# Altium PCB QI9-2604-A01_.PcbDoc (part 1 of 3)
Units mm, origin at the board's own origin, x right, y up, seen from the top; angles counter-clockwise.
Board outline 152.4 x 101.6 mm, 2 copper layers (Top Layer, Bottom Layer); 241 components, 189 nets, 865 pads, 150 vias.
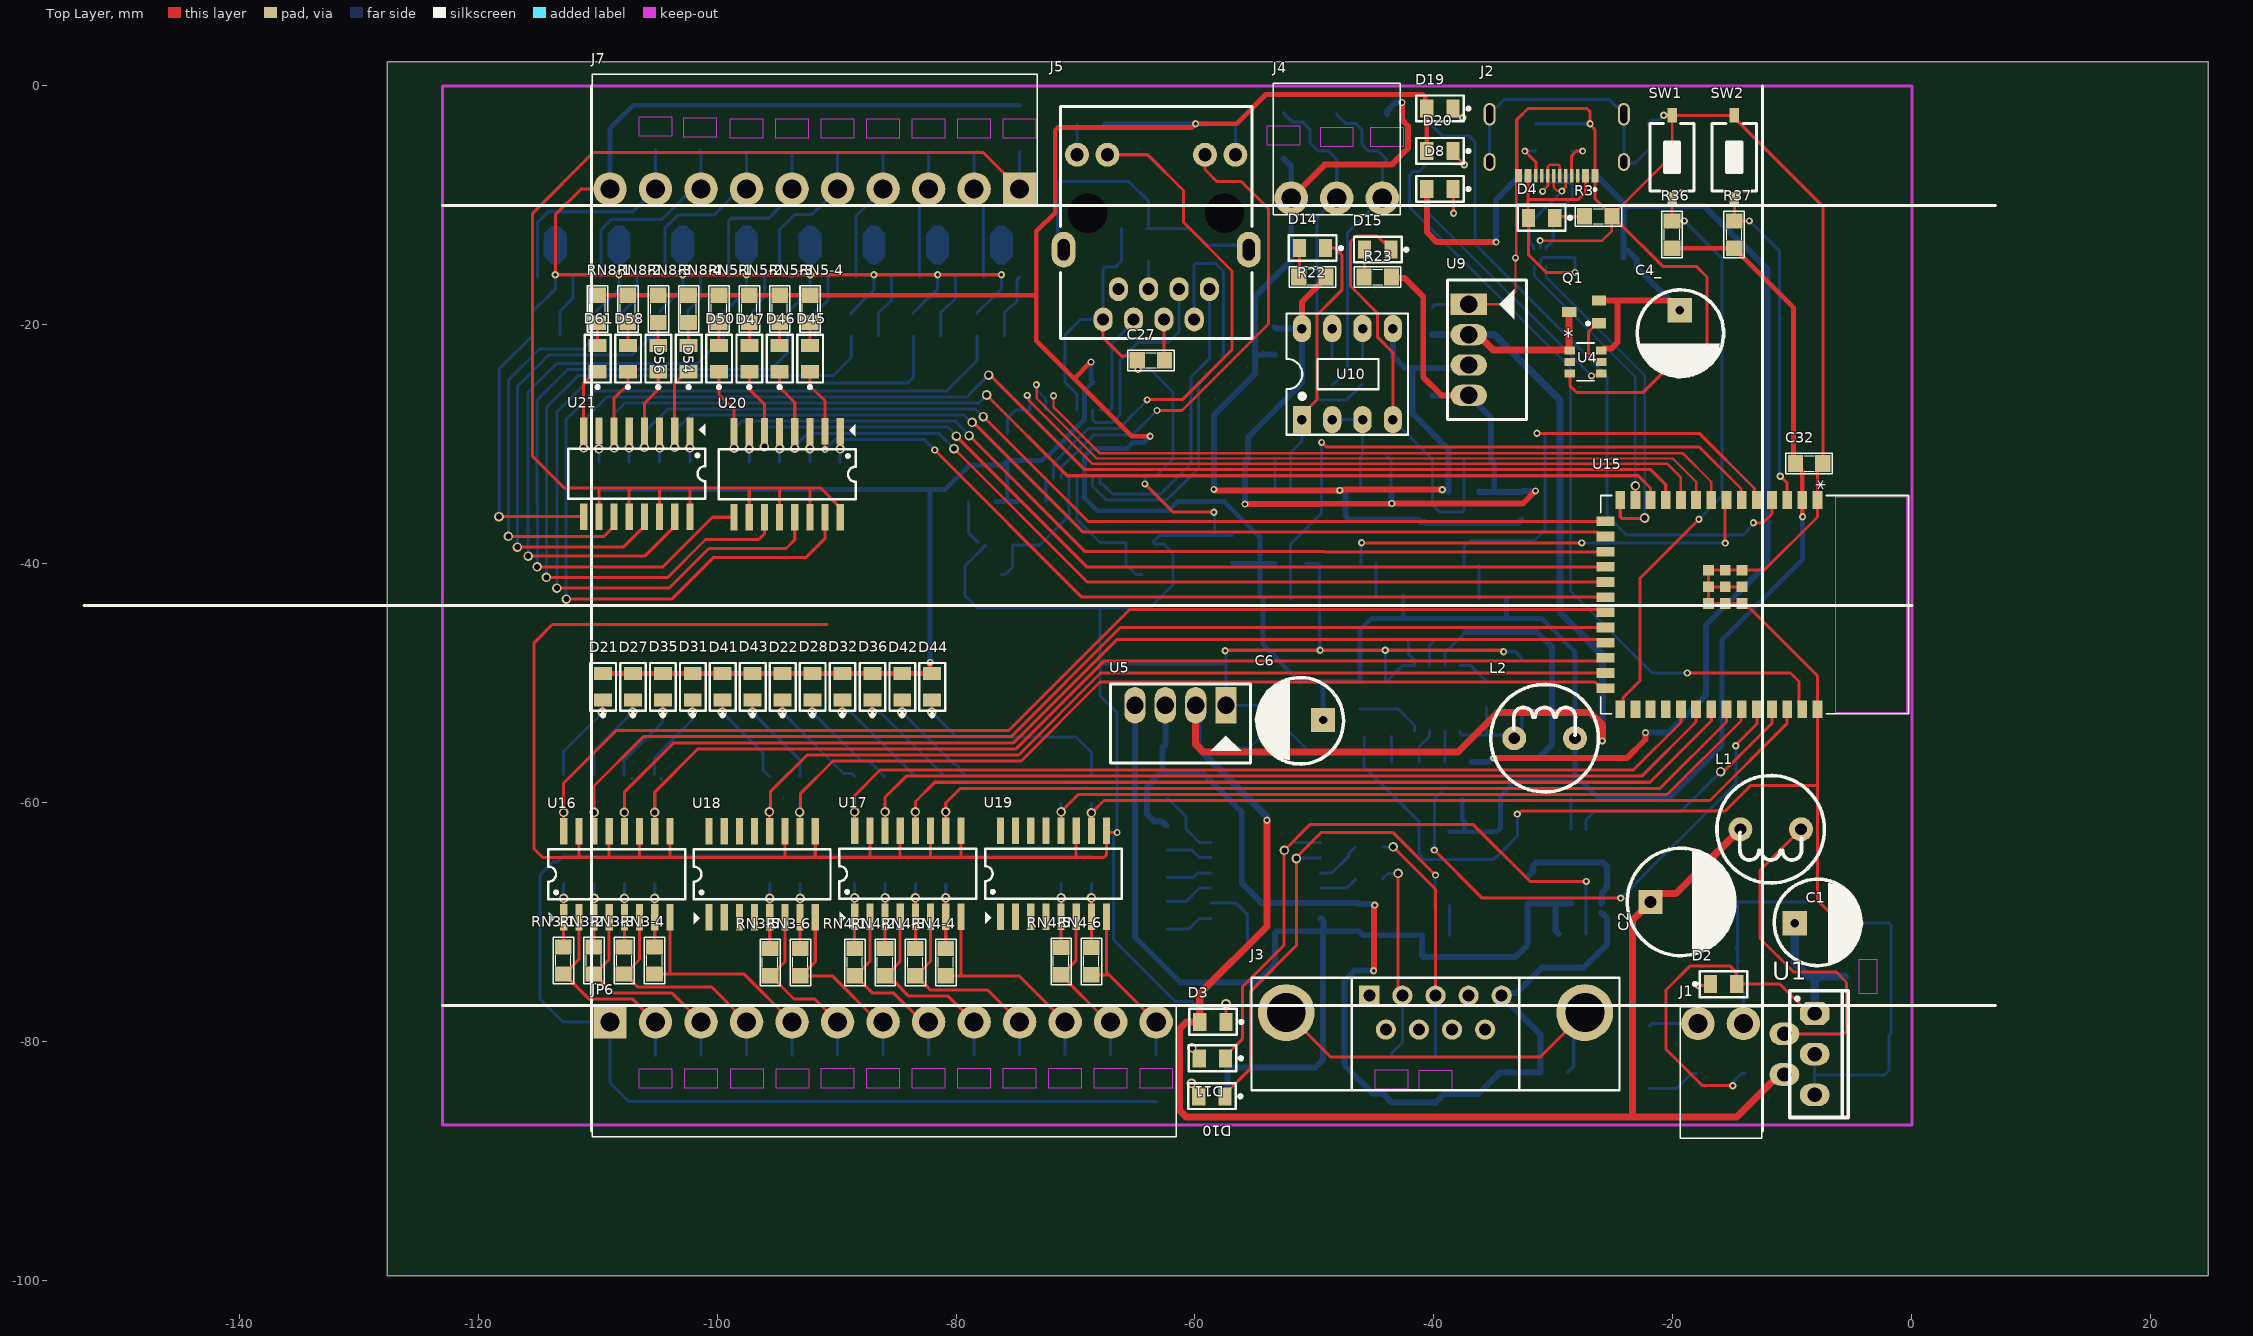
[diagram p0: Top Layer view]
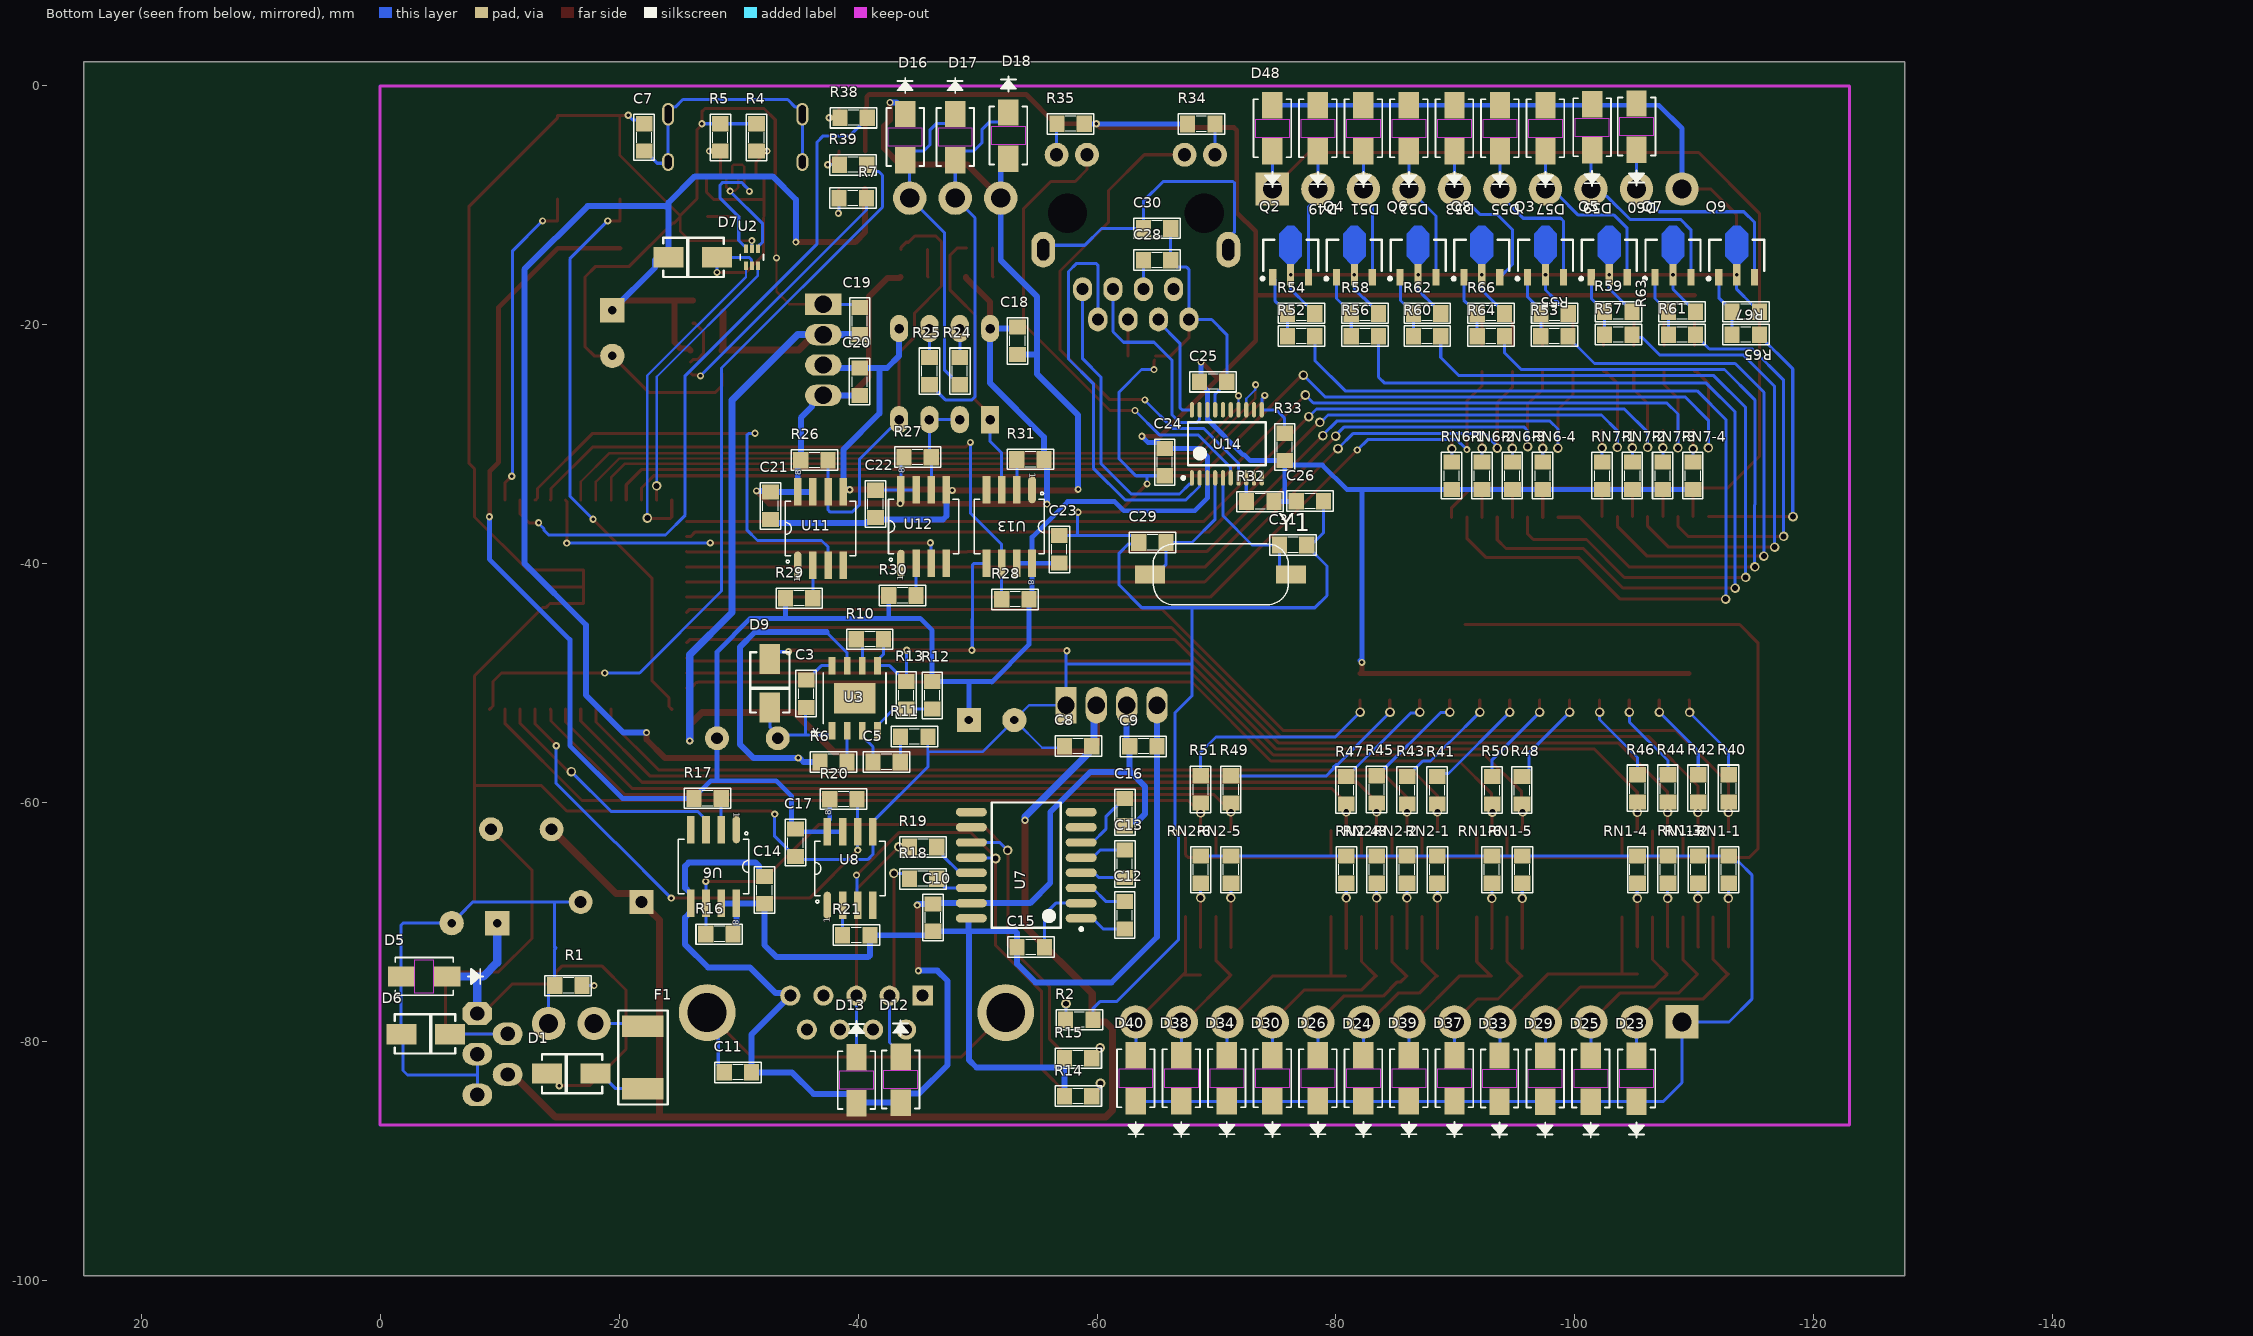
[diagram p1: Bottom Layer view, seen from below]
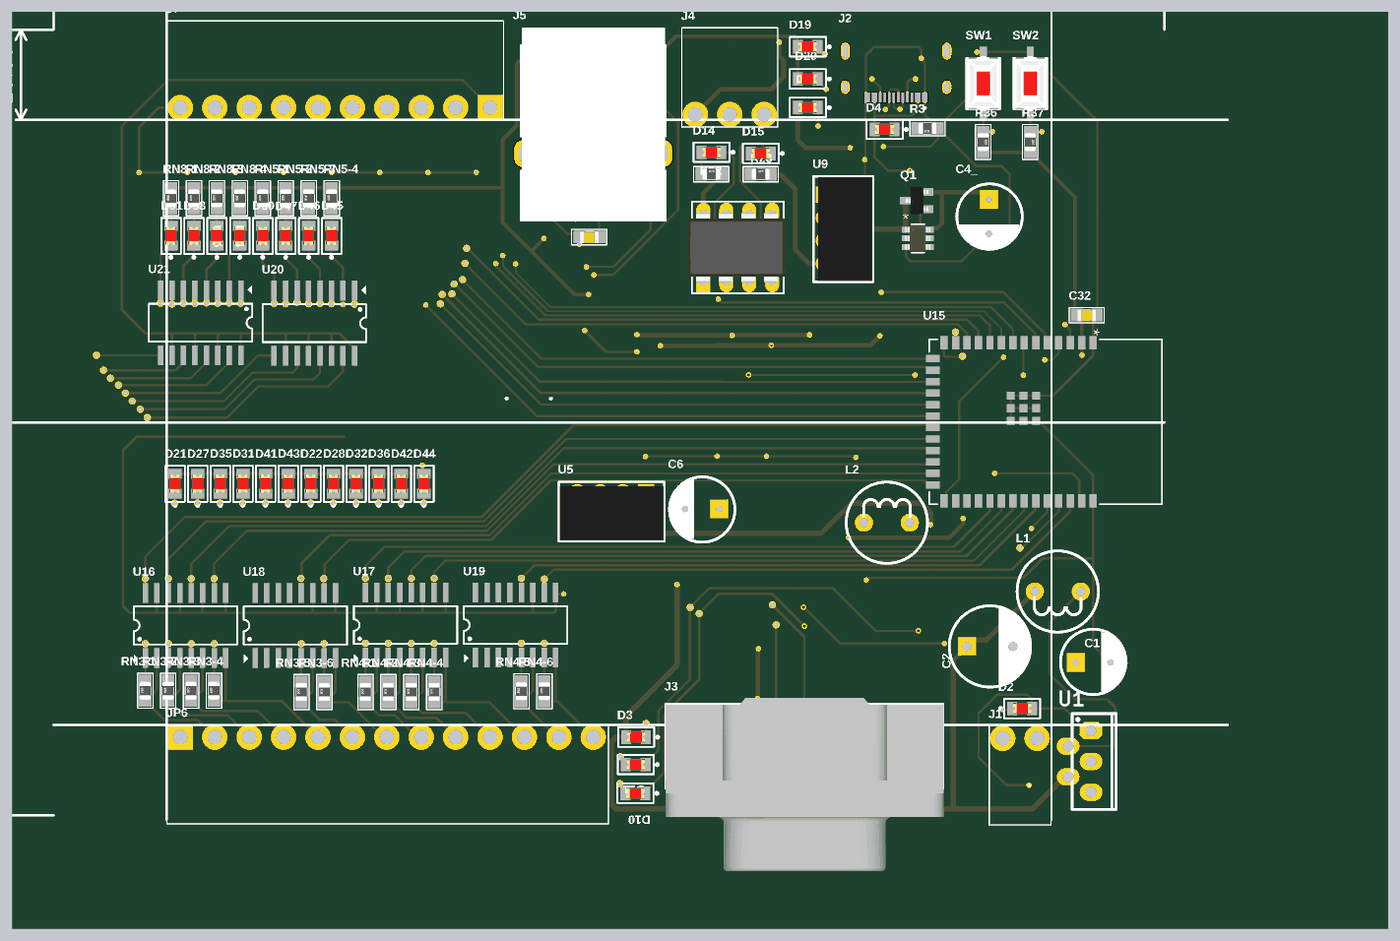
[diagram p3: 3D render of the assembled board from above, using the file's embedded part models]
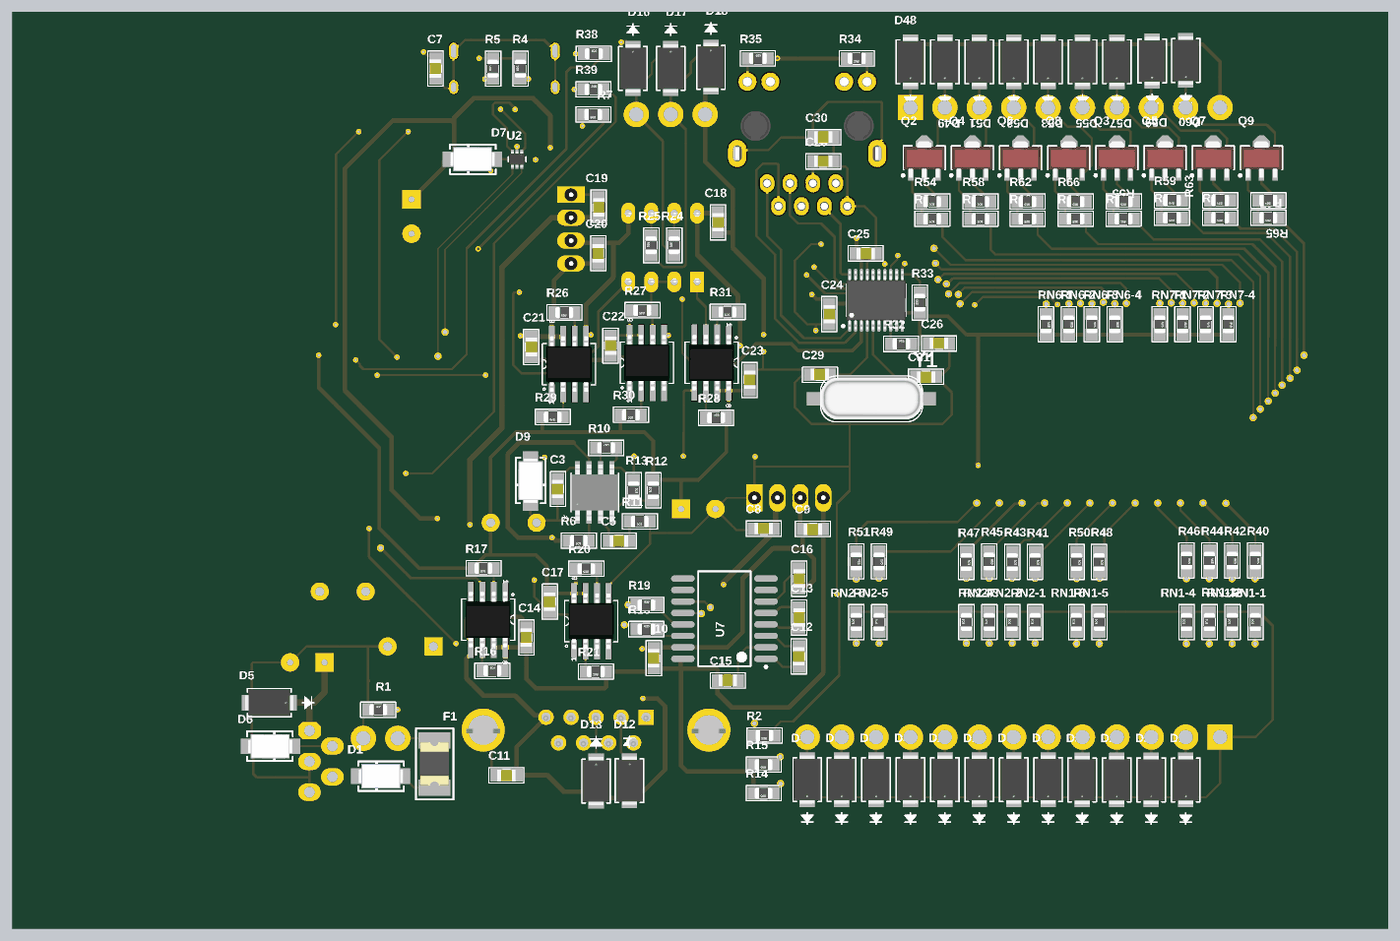
[diagram p4: 3D render of the assembled board from below, using the file's embedded part models]

## Layer stack, top to bottom
Top Solder: solder mask 0.0102, Solder Resist, Dk 3.5
Top Layer: signal copper 0.0356
Dielectric 1: dielectric 0.32, FR-4, Dk 4.8
Bottom Layer: signal copper 0.0356
Bottom Solder: solder mask 0.0102, Solder Resist, Dk 3.5

## Board outline
-127.6,-99.6 24.8,-99.6 24.8,2 -127.6,2

## Design rules (kind name [scope] priority, off if disabled: settings)
Clearance Clearance_1 [InComponent('U2') or InComponent('j2')] p1: gap=0.1 ignorepadtopadclearanceinfootprint=TRUE
Clearance [All] p2: gap=0.254 ignorepadtopadclearanceinfootprint=FALSE
PolygonConnect [All] p1: connectstyle=Relief reliefconductorwidth=0.254 reliefentries=4 polygonreliefangle="90 Angle" airgapwidth=0.254
RoutingVias [All] p1: holewidth=0.5 width=0.8 viastyle="Through Hole" minholewidth=0.3 minwidth=0.6 maxholewidth=0.7 maxwidth=1.2
SolderMaskExpansion [All] p1: expansion=0 istentingtop=FALSE
SupplyNets "Schematic Supply Nets_12" [InNet('VBUS')] p1: voltage=0.000
SupplyNets "Schematic Supply Nets_11" [InNet('3.3V')] p2: voltage=0.000
SupplyNets "Schematic Supply Nets_10" [InNet('OCOM_N')] p3: voltage=0.000
SupplyNets "Schematic Supply Nets_9" [InNet('GND_RS485')] p4: voltage=0.000
SupplyNets "Schematic Supply Nets_8" [InNet('5V_RS232')] p5: voltage=0.000
SupplyNets "Schematic Supply Nets_7" [InNet('5V_RS485')] p6: voltage=0.000
SupplyNets "Schematic Supply Nets_6" [InNet('5VP')] p7: voltage=0.000
SupplyNets "Schematic Supply Nets_5" [InNet('GND_RS232')] p8: voltage=0.000
SupplyNets "Schematic Supply Nets_4" [InNet('24V')] p9: voltage=0.000
SupplyNets "Schematic Supply Nets_3" [InNet('OCOM_P')] p10: voltage=0.000
SupplyNets "Schematic Supply Nets_2" [InNet('5V')] p11: voltage=0.000
SupplyNets "Schematic Supply Nets_1" [InNet('GND')] p12: voltage=0.000
SupplyNets "Schematic Supply Nets" [InNet('ICOM')] p13: voltage=0.000
UnRoutedNet [All] p1: checkbadconnections=TRUE
Width [All] p1: maxlimit=1 minlimit=0.2 preferedwidth=0.254
29 further rules are at their usual default settings.

## Components (designator, comment, footprint, x,y, rotation, side; value= is the part's Value field where it differs from the comment)
C1 "Cap2" C2 -9.793,-70.086 r90 top value=220uF/50V
C2 "" c3 -21.861,-68.314 r0 top value=220uF,16V
C3 "Cap" 0805 -35.657,-50.884 r270 bottom value=104
C4_ "Cap2" C2 -19.431,-18.796 r0 top value=220uF/50V
C5 "Cap" 0805 -42.388,-56.599 r180 bottom value=220
C6 "Cap2" C2 -49.276,-53.086 r270 top value=220uF/50V
C7 "Cap" 0805 -22.098,-4.318 r270 bottom value=4.7nF
C8 "Cap" 0805 -58.42,-55.282 r0 bottom value=4.7uF
C9 "Cap" 0805 -63.881,-55.282 r180 bottom value=22uF
C10 "Cap" 0805 -46.276,-69.622 r270 bottom value=104
C11 "Cap" 0805 -29.946,-82.572 r180 bottom value=4.7nF
C12 "Cap" 0805 -62.334,-69.429 r270 bottom value=22uF
C13 "Cap" 0805 -62.334,-65.111 r90 bottom value=22uF
C14 "Cap" 0805 -32.172,-67.327 r270 bottom value=104
C15 "Cap" 0805 -54.447,-72.096 r0 bottom value=22uF
C16 "Cap" 0805 -62.334,-60.793 r90 bottom value=22uF
C17 "Cap" 0805 -34.762,-63.354 r270 bottom value=104
C18 "Cap" 0805 -53.34,-21.336 r90 bottom value=104
C19 "Cap" 0805 -40.132,-19.685 r90 bottom value=4.7uF
C20 "Cap" 0805 -40.132,-24.765 r270 bottom value=22uF
C21 "Cap" 0805 -32.665,-35.145 r90 bottom value=104
C22 "Cap" 0805 -41.452,-34.992 r90 bottom value=104
C23 "Cap" 0805 -56.845,-38.793 r90 bottom value=104
C24 "Cap" 0805 -65.659,-31.496 r90 bottom value=104
C25 "Cap" 0805 -69.723,-24.765 r180 bottom value=104
C26 "Cap" 0805 -77.821,-34.777 r0 bottom value=104
C27 "Cap" 0805 -63.683,-22.966 r0 top value=1nF
C28 "Cap" 0805 -65.024,-14.605 r0 bottom value=1nF
C29 "Cap" 0805 -64.643,-38.227 r0 bottom value=22pF
C30 "Cap" 0805 -65.024,-11.938 r0 bottom value=4.7nF
C31 "Cap" 0805 -76.406,-38.434 r180 bottom value=22pF
C32 "Cap" 0805 -8.591,-31.609 r0 top value=104
D1 "1N5822" DIODE_DO214AC_SMA -16.002,-82.677 r0 bottom
D2 "LED" LED_0805_RED -15.748,-75.184 r180 top
D3 "LED" LED_0805_RED -58.504,-78.359 r0 top
D4 "LED" LED_0805_RED -30.988,-11.049 r0 top
D5 "SMAJ30CA" SMA_STM -3.683,-74.549 r0 bottom value=SMAJ30A
D6 "1N5822" DIODE_DO214AC_SMA -3.81,-79.375 r180 bottom
D7 "1N5822" DIODE_DO214AC_SMA -26.162,-14.351 r0 bottom
D8 "LED" LED_0805_RED -39.497,-8.636 r0 top
D9 "1N5822" DIODE_DO214AC_SMA -32.609,-49.995 r270 bottom
D10 "LED" LED_0805_RED -58.59,-84.582 r0 top
D11 "LED" LED_0805_RED -58.547,-81.407 r0 top
D12 "SMAJ15CA" SMA_STM -43.561,-83.185 r270 bottom value=SMAJ30A
D13 "SMAJ15CA" SMA_STM -39.866,-83.229 r270 bottom value=SMAJ30A
D14 "LED" LED_0805_RED -50.165,-13.589 r0 top
D15 "LED" LED_0805_RED -44.704,-13.716 r0 top
D16 "SMAJ9CA" SMA_STM -43.942,-4.293 r270 bottom value=SMAJ30A
D17 "SMAJ9CA" SMA_STM -48.133,-4.293 r270 bottom value=SMAJ30A
D18 "SMAJ9CA" SMA_STM -52.578,-4.166 r270 bottom value=SMAJ30A
D19 "LED" LED_0805_RED -39.497,-1.905 r0 top
D20 "LED" LED_0805_RED -39.497,-5.461 r0 top
D21 "LED" LED_0805_RED -109.557,-50.295 r270 top
D22 "LED" LED_0805_RED -94.525,-50.295 r270 top
D23 "SMAJ30CA" SMA_STM -105.156,-83.096 r90 bottom value=SMAJ30A
D24 "SMAJ30CA" SMA_STM -82.296,-83.071 r90 bottom value=SMAJ30A
D25 "SMAJ30CA" SMA_STM -101.334,-83.096 r90 bottom value=SMAJ30A
D26 "SMAJ30CA" SMA_STM -78.486,-83.071 r90 bottom value=SMAJ30A
D27 "LED" LED_0805_RED -107.052,-50.295 r270 top
D28 "LED" LED_0805_RED -92.02,-50.295 r270 top
D29 "SMAJ30CA" SMA_STM -97.513,-83.096 r90 bottom value=SMAJ30A
D30 "SMAJ30CA" SMA_STM -74.676,-83.071 r90 bottom value=SMAJ30A
D31 "LED" LED_0805_RED -102.041,-50.295 r270 top
D32 "LED" LED_0805_RED -89.514,-50.295 r270 top
D33 "SMAJ30CA" SMA_STM -93.691,-83.096 r90 bottom value=SMAJ30A
D34 "SMAJ30CA" SMA_STM -70.866,-83.071 r90 bottom value=SMAJ30A
D35 "LED" LED_0805_RED -104.547,-50.295 r270 top
D36 "LED" LED_0805_RED -87.009,-50.295 r270 top
D37 "SMAJ30CA" SMA_STM -89.916,-83.071 r90 bottom value=SMAJ30A
D38 "SMAJ30CA" SMA_STM -67.056,-83.071 r90 bottom value=SMAJ30A
D39 "SMAJ30CA" SMA_STM -86.106,-83.071 r90 bottom value=SMAJ30A
D40 "SMAJ30CA" SMA_STM -63.246,-83.071 r90 bottom value=SMAJ30A
D41 "LED" LED_0805_RED -99.536,-50.295 r270 top
D42 "LED" LED_0805_RED -84.504,-50.295 r270 top
D43 "LED" LED_0805_RED -97.031,-50.295 r270 top
D44 "LED" LED_0805_RED -81.998,-50.295 r270 top
D45 "LED" LED_0805_RED -92.226,-22.829 r270 top
D46 "LED" LED_0805_RED -94.766,-22.829 r270 top
D47 "LED" LED_0805_RED -97.306,-22.829 r270 top
D48 "SMAJ30CA" SMA_STM -74.676,-3.556 r90 bottom value=SMAJ30A
D49 "SMAJ30CA" SMA_STM -78.486,-3.556 r90 bottom value=SMAJ30A
D50 "LED" LED_0805_RED -99.846,-22.829 r270 top
D51 "SMAJ30CA" SMA_STM -82.296,-3.556 r90 bottom value=SMAJ30A
D52 "SMAJ30CA" SMA_STM -86.106,-3.556 r90 bottom value=SMAJ30A
D53 "SMAJ30CA" SMA_STM -89.916,-3.556 r90 bottom value=SMAJ30A
D54 "LED" LED_0805_RED -102.386,-22.829 r270 top
D55 "SMAJ30CA" SMA_STM -93.726,-3.556 r90 bottom value=SMAJ30A
D56 "LED" LED_0805_RED -104.926,-22.829 r270 top
D57 "SMAJ30CA" SMA_STM -97.536,-3.556 r90 bottom value=SMAJ30A
D58 "LED" LED_0805_RED -107.466,-22.829 r270 top
D59 "SMAJ30CA" SMA_STM -101.44,-3.47 r90 bottom value=SMAJ30A
D60 "SMAJ30CA" SMA_STM -105.162,-3.409 r90 bottom value=SMAJ30A
D61 "LED" LED_0805_RED -110.006,-22.829 r270 top
F1 "3A" FUSE_1812(4532) -21.971,-81.332 r270 bottom
J1 "KF-3.810-2R" KF2-3.81 -17.907,-78.486 r0 top
J2 "UJ20-C-H-G-MSMT-4-P16-TR" UJ20-C-H-G-MSMT-4-P16 -29.718,-4.953 r180 top
J3 "D Connector 9" DSUB1.385-2H9 -39.866,-77.574 r90 top
J4 "KF-3.81-3R" KF3-3.81 -44.323,-9.398 r180 top
J5 "HR911105A" HR911105A -63.246,-10.668 r0 top
J7 "KF-3.81-10R" KF10-3.81 -74.676,-8.636 r180 top value="Connector 10"
JP6 "HEADER 13" kf13-3.81 -108.966,-78.359 r0 top
L1 "Inductor" L1A -9.271,-62.23 r180 top value=33uH
L2 "Inductor" L1A -33.274,-54.61 r0 top value=10uH
Q1 "A0347A" SOT23_ -27.432,-18.923 r90 top
Q2 "BCX56" SOT89 -76.206,-14.214 r90 bottom value=C9014
Q3 "BCX56" SOT89 -97.542,-14.214 r90 bottom value=C9014
Q4 "BCX56" SOT89 -81.54,-14.214 r90 bottom value=C9014
Q5 "BCX56" SOT89 -102.876,-14.214 r90 bottom value=C9014
Q6 "BCX56" SOT89 -86.874,-14.214 r90 bottom value=C9014
Q7 "BCX56" SOT89 -108.21,-14.214 r90 bottom value=C9014
Q8 "BCX56" SOT89 -92.208,-14.214 r90 bottom value=C9014
Q9 "BCX56" SOT89 -113.544,-14.214 r90 bottom value=C9014
R1 "Res1" SM-RES-0805 -14.605,-75.311 r180 bottom value=2K2
R2 "Res1" SM-RES-0805 -59.652,-78.186 r0 bottom value=330
R3 "Res1" SM-RES-0805 -25.105,-10.922 r180 top value=360
R4 "Res1" SM-RES-0805 -31.494,-5.461 r90 bottom value=5K1
R5 "Res1" SM-RES-0805 -28.461,-5.461 r90 bottom value=5K1
R6 "Res1" SM-RES-0805 -39.086,-56.599 r0 bottom value=5K1
R7 "Res1" SM-RES-0805 -40.702,-9.398 r0 bottom value=360
R10 "Res1" SM-RES-0805 -39.848,-46.312 r180 bottom value=200K
R11 "Res1" SM-RES-0805 -45.847,-54.476 r0 bottom value=68K
R12 "Res1" SM-RES-0805 -46.198,-52.154 r90 bottom value=5K1
R13 "Res1" SM-RES-0805 -44.039,-49.868 r270 bottom value=1K6
R14 "Res1" SM-RES-0805 -59.563,-84.582 r0 bottom value=360
R15 "Res1" SM-RES-0805 -59.563,-81.407 r0 bottom value=360
R16 "Res1" SM-RES-0805 -27.246,-71.003 r180 bottom value=5k1
R17 "Res1" SM-RES-0805 -28.539,-59.65 r0 bottom value=220
R18 "Res1" SM-RES-0805 -44.3,-66.381 r180 bottom value=0
R19 "Res1" SM-RES-0805 -44.3,-63.714 r180 bottom value=0
R20 "Res1" SM-RES-0805 -39.92,-59.722 r0 bottom value=5k1
R21 "Res1" SM-RES-0805 -40.985,-71.101 r0 bottom value=360
R22 "Res1" SM-RES-0805 -51.308,-16.002 r0 top value=360
R23 "Res1" SM-RES-0805 -45.847,-16.002 r0 top value=360
R24 "Res1" SM-RES-0805 -48.514,-25.019 r90 bottom value=0
R25 "Res1" SM-RES-0805 -45.974,-25.019 r90 bottom value=0
R26 "Res1" SM-RES-0805 -37.491,-31.335 r0 bottom value=5k1
R27 "Res1" SM-RES-0805 -46.127,-31.081 r0 bottom value=5k1
R28 "Res1" SM-RES-0805 -52.019,-42.984 r180 bottom value=5k1
R29 "Res1" SM-RES-0805 -36.205,-42.903 r0 bottom value=220
R30 "Res1" SM-RES-0805 -44.857,-42.663 r0 bottom value=220
R31 "Res1" SM-RES-0805 -55.567,-31.275 r0 bottom value=360
R32 "Res1" SM-RES-0805 -72.517,-34.798 r180 bottom value=0
R33 "Res1" SM-RES-0805 -75.706,-31.369 r90 bottom value=5K1
R34 "Res1" SM-RES-0805 -69.873,-3.2 r0 bottom value=220
R35 "Res1" SM-RES-0805 -56.642,-3.175 r180 bottom value=220
R36 "Res1" SM-RES-0805 -20.066,-11.303 r270 top value=5k1
R37 "Res1" SM-RES-0805 -14.859,-11.303 r270 top value=5k1
R38 "Res1" SM-RES-0805 -38.481,-2.667 r180 bottom value=220
R39 "Res1" SM-RES-0805 -38.441,-6.604 r180 bottom value=220
R40 "Res1" SM-RES-0805 -112.866,-57.663 r270 bottom value=220
R41 "Res1" SM-RES-0805 -88.482,-57.82 r270 bottom value=220
R42 "Res1" SM-RES-0805 -110.326,-57.663 r270 bottom value=220
R43 "Res1" SM-RES-0805 -85.968,-57.82 r270 bottom value=220
R44 "Res1" SM-RES-0805 -107.786,-57.663 r270 bottom value=220
R45 "Res1" SM-RES-0805 -83.402,-57.756 r270 bottom value=220
R46 "Res1" SM-RES-0805 -105.246,-57.663 r270 bottom value=220
R47 "Res1" SM-RES-0805 -80.862,-57.82 r270 bottom value=220
R48 "Res1" SM-RES-0805 -95.569,-57.82 r270 bottom value=220
R49 "Res1" SM-RES-0805 -71.21,-57.756 r270 bottom value=220
R50 "Res1" SM-RES-0805 -93.08,-57.82 r270 bottom value=220
R51 "Res1" SM-RES-0805 -68.67,-57.756 r270 bottom value=220
R52 "Res1" SM-RES-0805 -78.232,-20.955 r0 bottom value=2K2
R53 "Res1" SM-RES-0805 -99.422,-20.955 r0 bottom value=2K2
R54 "Res1" SM-RES-0805 -78.232,-19.05 r0 bottom value=510
R55 "Res1" SM-RES-0805 -99.441,-19.05 r0 bottom value=510
R56 "Res1" SM-RES-0805 -83.566,-20.955 r0 bottom value=2K2
R57 "Res1" SM-RES-0805 -104.775,-20.828 r0 bottom value=2K2
R58 "Res1" SM-RES-0805 -83.566,-19.05 r0 bottom value=510
R59 "Res1" SM-RES-0805 -104.775,-18.923 r0 bottom value=510
R60 "Res1" SM-RES-0805 -88.773,-20.955 r0 bottom value=2K2
R61 "Res1" SM-RES-0805 -110.109,-20.828 r0 bottom value=2K2
R62 "Res1" SM-RES-0805 -88.773,-19.05 r0 bottom value=510
R63 "Res1" SM-RES-0805 -110.109,-18.923 r0 bottom value=510
R64 "Res1" SM-RES-0805 -94.107,-20.955 r0 bottom value=2K2
R65 "Res1" SM-RES-0805 -115.443,-20.828 r0 bottom value=2K2
R66 "Res1" SM-RES-0805 -94.107,-19.05 r0 bottom value=510
R67 "Res1" SM-RES-0805 -115.443,-18.923 r0 bottom value=510
RN1-1 "Res1" SM-RES-0805 -112.866,-66.75 r90 bottom value=2K2
RN1-2 "Res1" SM-RES-0805 -110.326,-66.75 r90 bottom value=2K2
RN1-3 "Res1" SM-RES-0805 -107.786,-66.75 r90 bottom value=2K2
RN1-4 "Res1" SM-RES-0805 -105.246,-66.75 r90 bottom value=2K2
RN1-5 "Res1" SM-RES-0805 -95.594,-66.75 r90 bottom value=2K2
RN1-6 "Res1" SM-RES-0805 -93.054,-66.75 r90 bottom value=2K2
RN2-1 "Res1" SM-RES-0805 -88.482,-66.75 r90 bottom value=2K2
RN2-2 "Res1" SM-RES-0805 -85.942,-66.75 r90 bottom value=2K2
RN2-3 "Res1" SM-RES-0805 -83.402,-66.75 r90 bottom value=2K2
RN2-4 "Res1" SM-RES-0805 -80.862,-66.75 r90 bottom value=2K2
RN2-5 "Res1" SM-RES-0805 -71.21,-66.75 r90 bottom value=2K2
RN2-6 "Res1" SM-RES-0805 -68.67,-66.75 r90 bottom value=2K2
RN3-1 "Res1" SM-RES-0805 -112.866,-74.358 r90 top value=510
RN3-2 "Res1" SM-RES-0805 -110.326,-74.358 r90 top value=510
RN3-3 "Res1" SM-RES-0805 -107.786,-74.358 r90 top value=510
RN3-4 "Res1" SM-RES-0805 -105.246,-74.358 r90 top value=510
RN3-5 "Res1" SM-RES-0805 -95.569,-74.497 r90 top value=510
RN3-6 "Res1" SM-RES-0805 -93.029,-74.497 r90 top value=510
RN4-1 "Res1" SM-RES-0805 -88.482,-74.497 r90 top value=510
RN4-2 "Res1" SM-RES-0805 -85.942,-74.497 r90 top value=510
RN4-3 "Res1" SM-RES-0805 -83.402,-74.497 r90 top value=510
RN4-4 "Res1" SM-RES-0805 -80.862,-74.497 r90 top value=510
RN4-5 "Res1" SM-RES-0805 -71.21,-74.411 r90 top value=510
RN4-6 "Res1" SM-RES-0805 -68.67,-74.411 r90 top value=510
RN5-1 "Res1" SM-RES-0805 -99.847,-19.813 r90 top value=220
RN5-2 "Res1" SM-RES-0805 -97.306,-19.813 r90 top value=220
RN5-3 "Res1" SM-RES-0805 -94.765,-19.813 r90 top value=220
RN5-4 "Res1" SM-RES-0805 -92.224,-19.813 r90 top value=220
RN6-1 "Res1" SM-RES-0805 -89.69,-31.496 r270 bottom value=360
RN6-2 "Res1" SM-RES-0805 -92.23,-31.496 r270 bottom value=360
RN6-3 "Res1" SM-RES-0805 -94.77,-31.496 r270 bottom value=360
RN6-4 "Res1" SM-RES-0805 -97.31,-31.496 r270 bottom value=360
RN7-1 "Res1" SM-RES-0805 -102.287,-31.496 r270 bottom value=360
RN7-2 "Res1" SM-RES-0805 -104.816,-31.496 r270 bottom value=360
RN7-3 "Res1" SM-RES-0805 -107.36,-31.496 r270 bottom value=360
RN7-4 "Res1" SM-RES-0805 -109.883,-31.496 r270 bottom value=360
RN8-1 "Res1" SM-RES-0805 -110.011,-19.813 r90 top value=220
RN8-2 "Res1" SM-RES-0805 -107.47,-19.813 r90 top value=220
RN8-3 "Res1" SM-RES-0805 -104.929,-19.813 r90 top value=220
RN8-4 "Res1" SM-RES-0805 -102.388,-19.813 r90 top value=220
SW1 "SW-SMD" SW-SMD -20.066,-5.969 r270 top
SW2 "SW-SMD" SW-SMD -14.859,-5.969 r90 top
U1 "LM2576HVT-5.0" T05 -8.128,-77.655 r270 top
U2 "USBLC6-2P6" SOT-666_STM -31.115,-14.351 r270 bottom
U3 "MP1584EN-LF-Z" SOIC8E_MPS -39.721,-51.265 r90 bottom
U4 "LTC4412ES6#TRMPBF" SOT-6_S_LIT -27.305,-23.114 r0 top
U5 "B0505S" B0505S -57.404,-51.853 r180 top
U6 "HCPL-0600" SOIC8_50_328_25X90_SMT -27.905,-65.344 r270 bottom
U7 "SP232" soic16_m -54.079,-65.238 r0 bottom
U8 "HCPL-0600" SOIC8_50_328_25X90_SMT -39.334,-65.513 r90 bottom
U9 "B0505S" B0505S -37.084,-18.288 r270 top
U10 "MAX485" DIP8 -47.371,-24.13 r0 top
U11 "HCPL-0600" SOIC8_50_328_25X90_SMT -36.856,-37.05 r90 bottom
U12 "HCPL-0600" SOIC8_50_328_25X90_SMT -45.492,-36.892 r90 bottom
U13 "HCPL-0600" SOIC8_50_328_25X90_SMT -52.654,-36.888 r270 bottom
U14 "CH9121t" tssop20 -70.866,-29.972 r90 bottom
U15 "ESP32-S3-WROOM-1-N8" ESP32-S3-WROOM-1_EXP -13.154,-43.434 r270 top locked
U16 "TL2904" SOP16 -108.396,-65.988 r0 top
U17 "TL2904" SOP16 -84.037,-65.944 r0 top
U18 "TL2904" SOP16 -96.229,-65.988 r0 top
U19 "TL2904" SOP16 -71.845,-65.944 r0 top
U20 "TL2904" SOP16 -94.135,-32.512 r180 top
U21 "TL2904" SOP16 -106.723,-32.464 r180 top
Y1 "25 MHZ" Crystal.smd_N -67.945,-40.894 r90 bottom

## Footprints (in the part's own frame and the unit in brackets; to place one, negate y for a bottom-side part, rotate by r counter-clockwise, add the part's x,y. Pads: shape width x height; smd on the part's side, far side on the other; paste and mask are expansions set on the pad)
0805 [mil] "Compoment SMD 80x50mil"
  rect 50x55 smd: 1(-45,0) 2(45,0)
  silkscreen extent -77,-34 76,33, body extent -40,-27 40,23, height 24
B0505S [mil]
  rect 70x120 hole 57: 1(0,0)
  oval 70x120 hole 57: 2(100,0) 3(200,0) 4(300,0)
  silkscreen extent -80,-70 380,190, body extent -76,-50 376,186, height 394
C2 [mil]
  rect 80x80 hole 27.56: 1(0,0)
  round 80 hole 27.56: 2(0,-150)
  silkscreen extent -140,-225 145,67
c3 [mm]
  rect 2x2 hole 1: 1(0,0)
  round 2 hole 1: 2(5.08,0)
  silkscreen extent -1.96,-4.5 7.04,4.5
Crystal.smd_N [mm] "HC49USxx package"
  rect 1.5x2.5 smd: 1(0,3.5) 2(0,-8.3)
  silkscreen extent -2.55,-8.08 2.55,3.22, body extent -2.29,-8.11 2.36,3.24, height 4
DIODE_DO214AC_SMA [mm] "Diode 2214AC- SMA type"
  rect 2.5x1.7 smd: 1(-2.032,0) 2(2.032,0)
  silkscreen extent -2.59,-1.63 2.46,1.7, body extent -2.53,-1.35 2.47,1.35, height 2.25
DIP8 [mil] "DIP, 8-Leads, Row Spacing 7.62mm, Pitch 2.54mm, Body 9.91x6.73mm"
  rect 60x90 hole 31: 1(-145,-150)
  oval 60x90 hole 31: 2(-45,-150) 3(55,-150) 4(155,-150) 5(155,150) 6(55,150) 7(-45,150) 8(-145,150)
  silkscreen extent -195,-200 205,200, body extent -213,-153 213,153, height 177
DSUB1.385-2H9 [mm] "Connector; D Subminiature; 9 Position; Right Angle; Pitch 1.385 mm"
  rect 1.69x1.69 hole 1: 1(1.42,5.54)
  round 1.69 hole 1: 2(1.42,2.77) 3(1.42,0) 4(1.42,-2.77) 5(1.42,-5.54) 6(-1.42,4.155) 7(-1.42,1.385) 8(-1.42,-1.385) 9(-1.42,-4.155)
  round 4.76 hole 3.26: 10(0,-12.495) 11(0,12.495)
  silkscreen extent -6.5,-15.4 2.9,15.4, body extent -15.62,-15.43 3.58,15.38, height 12.52
ESP32-S3-WROOM-1_EXP [mil]
  rect 59x32 smd paste+0 mask+0: 1(-344.49,207.09) 2(-344.49,157.09) 3(-344.49,107.09) 4(-344.49,57.09) 5(-344.49,7.09) 6(-344.49,-42.91) 7(-344.49,-92.91) 8(-344.49,-142.91) 9(-344.49,-192.91) 10(-344.49,-242.91) 11(-344.49,-292.91) 12(-344.49,-342.91) 13(-344.49,-392.91) 14(-344.49,-442.91) 27(344.49,-442.91) 28(344.49,-392.91) 29(344.49,-342.91) 30(344.49,-292.91) 31(344.49,-242.91) 32(344.49,-192.91) 33(344.49,-142.91) 34(344.49,-92.91) 35(344.49,-42.91) 36(344.49,7.09) 37(344.49,57.09) 38(344.49,107.09) 39(344.49,157.09) 40(344.49,207.09)
  rect 32x59 smd paste+0 mask+0: 15(-275,-492.13) 16(-225,-492.13) 17(-175,-492.13) 18(-125,-492.13) 19(-75,-492.13) 20(-25,-492.13) 21(25,-492.13) 22(75,-492.13) 23(125,-492.13) 24(175,-492.13) 25(225,-492.13) 26(275,-492.13)
  rect 35x35 smd paste+0 mask+0: 41(-59.06,-96.85) 42(-114.17,-41.73) 43(-114.17,-96.85) 44(-114.17,-151.97) 45(-59.06,-151.97) 46(-3.94,-151.97) 47(-3.94,-96.85) 48(-3.94,-41.73) 49(-59.06,-41.73)
  Top Layer keep-out region: 354.5,502 -354.5,502 -354.5,266 354.5,266
  silkscreen extent -360,-507 360,507
FUSE_1812(4532) [mm]
  rect 1.78x3.5 smd: 1(-2.615,0) 2(2.615,0)
  silkscreen extent -3.94,-2.06 3.94,2.11, body extent -2.43,-1.61 2.39,1.61, height 1.32
HR911105A [mm] "Hanrun HR911105A RJ-45 Connector"
  round 1 hole 3.3 unplated paste-2539.97 mask+0.15: 0(-5.715,0) 0(5.715,0)
  oval 1.6x2 hole 1 paste-2539.97 mask+0.15: 1(4.45,-6.35) 2(3.18,-8.89) 3(1.91,-6.35) 4(0.64,-8.89) 5(-0.63,-6.35) 6(-1.9,-8.89) 7(-3.17,-6.35) 8(-4.44,-8.89)
  round 2 hole 1.1 paste-2539.97 mask+0.15: 9(6.625,4.9) 10(4.085,4.9) 11(-4.085,4.9) 12(-6.625,4.9)
  oval 2x3 hole 1 slot 1.8 at 90 deg paste-2539.97 mask+0.15: 13(7.745,-3.05) 14(-7.745,-3.05)
  silkscreen extent -8,-10.48 8,8.92, body extent -7.94,-10.48 7.94,10.92, height 13.6
KF2-3.81 [mm] "3,81mm - modular - blue - Horizontal wire entry - Pressure clamp - 10mm height - 03p"
  round 2.8 hole 1.6: 1(0,0) 2(3.81,0)
  silkscreen extent -1.49,-9.6 5.33,1.4
KF3-3.81 [mm] "3,81mm - modular - blue - Horizontal wire entry - Pressure clamp - 10mm height - 03p"
  round 2.8 hole 1.6: 1(0,0) 2(3.81,0) 3(7.62,0)
  silkscreen extent -1.49,-9.6 9.12,1.4
KF10-3.81 [mm] "3,81mm - modular - blue - Horizontal wire entry - Pressure clamp - 10mm height - 03p"
  rect 2.8x2.8 hole 1.6: 1(0,0)
  round 2.8 hole 1.6: 2(3.81,0) 3(7.62,0) 4(11.43,0) 5(15.24,0) 6(19.05,0) 7(22.86,0) 8(26.67,0) 9(30.48,0) 10(34.29,0)
  silkscreen extent -1.49,-9.6 35.78,1.4
kf13-3.81 [mm] "3,81mm - modular - blue - Horizontal wire entry - Pressure clamp - 10mm height - 03p"
  rect 2.8x2.8 hole 1.6: 1(0,0)
  round 2.8 hole 1.6: 2(3.81,0) 3(7.62,0) 4(11.43,0) 5(15.24,0) 6(19.05,0) 7(22.86,0) 8(26.67,0) 9(30.48,0) 10(34.29,0) 11(38.1,0) 12(41.91,0) 13(45.72,0)
  silkscreen extent -1.49,-9.6 47.4,1.4
L1A [mm]
  round 2 hole 1: 1(0,0) 2(5.08,0)
  silkscreen extent -1.96,-4.5 7.04,4.5
LED_0805_RED [mm] "LED SMD; Body 2.0 x 1.3 mm (LxW typ)"
  rect 1.1x1.5 smd: 1(-1.1,0) 2(1.1,0)
  silkscreen extent -1.98,-1.07 2.52,1.09, body extent -1.01,-0.62 1.01,0.63, height 1.1
SM-RES-0805 [mil]
  rect 50x55 smd: 1(0,0) 2(90,0)
  silkscreen extent -32,-34 121,33, body extent 6,-25 84,25, height 31
SMA_STM [mil]
  rect 87x67 smd paste+0 mask+0: 1(-76,0) 2(76,0)
  Top Layer keep-out region: -30.5,-55 -30.5,55 30.5,55 30.5,-55
  Keep-Out Layer region: -30.5,-55 -30.5,55 30.5,55 30.5,-55
  silkscreen extent -194,-62 96,62, body extent -106,-57 106,57, height 104
SOIC8_50_328_25X90_SMT [mil] "SOIC"
  oval 90x25 smd mask+3: 1(-121.32,75)
  rect 90x25 smd mask+3: 2(-121.32,25) 3(-121.32,-25) 4(-121.32,-75) 5(121.32,-75) 6(121.32,-25) 7(121.32,25) 8(121.32,75)
  silkscreen extent -114,-116 90,116, body extent -121,-98 121,98, height 79
SOIC8E_MPS [mil]
  rect 57.5x22 smd paste+0 mask+0: 1(-107.25,75) 2(-107.25,25) 3(-107.25,-25) 4(-107.25,-75) 5(107.25,-75) 6(107.25,-25) 7(107.25,25) 8(107.25,75)
  rect 101x136 smd paste-67.5 mask+0: EPAD(0,0)
  silkscreen extent -84,-104 84,104, body extent -122,-99 122,99, height 67
soic16_m [mm] "16-Pin Small Outline Integrated Circuit Package (SOIC16), IPC Low Density"
  oval 2.6x0.7 smd: 1(-4.6,4.445) 2(-4.6,3.175) 3(-4.6,1.905) 4(-4.6,0.635) 5(-4.6,-0.635) 6(-4.6,-1.905) 7(-4.6,-3.175) 8(-4.6,-4.445) 9(4.6,-4.445) 10(4.6,-3.175) 11(4.6,-1.905) 12(4.6,-0.635) 13(4.6,0.635) 14(4.6,1.905) 15(4.6,3.175) 16(4.6,4.445)
  silkscreen extent -4.72,-5.25 2.9,5.47, body extent -3.75,-5.25 3.75,5.25, height 2.65
SOP16 [mm] "Small Outline; 16 Leads; Body Width 5.6 mm; Pitch 1.27 mm"
  rect 0.6x2.2 smd: 1(-4.445,-3.6) 1(-4.445,-3.6) 2(-3.175,-3.6) 2(-3.175,-3.6) 3(-1.905,-3.6) 3(-1.905,-3.6) 4(-0.635,-3.6) 4(-0.635,-3.6) 5(0.635,-3.6) 5(0.635,-3.6) 6(1.905,-3.6) 6(1.905,-3.6) 7(3.175,-3.6) 7(3.175,-3.6) 8(4.445,-3.6) 8(4.445,-3.6) 9(4.445,3.6) 9(4.445,3.6) 10(3.175,3.6) 10(3.175,3.6) 11(1.905,3.6) 11(1.905,3.6) 12(0.635,3.6) 12(0.635,3.6) 13(-0.635,3.6) 13(-0.635,3.6) 14(-1.905,3.6) 14(-1.905,3.6) 15(-3.175,3.6) 15(-3.175,3.6) 16(-4.445,3.6) 16(-4.445,3.6)
  silkscreen extent -5.73,-4.19 5.73,2.1
SOT23_ [mm] "SOT 23B"
  rect 0.85x1.2 smd: 1(-0.95,-1.25) 2(0,1.25) 3(0.94,-1.245)
  silkscreen extent -1.1,-0.46 -0.85,-0.21, body extent -1.5,-1.3 1.5,1.2, height 1.06
SOT89 [mm] "SOT89, 3-Leads, Body 4.55x2.55mm, Pitch 1.50mm, Lead Span 4.1mm, IPC Medium Density"
  rect 1.4x0.6 smd: 1(-1.8,1.5) 3(-1.8,-1.5)
  rect 1.8x0.6 smd: 2(-1.6,0)
  Top Layer region: -0.7,0.3 -0.05,0.95 1.85,0.95 2.5,0.3 2.5,-0.3 1.85,-0.95 -0.05,-0.95 -0.7,-0.3
  silkscreen extent -2.05,-2.3 1.32,2.48, body extent -2.16,-2.25 1.84,2.25, height 1.5
SOT-6_S_LIT [mil]
  rect 34.5x26 smd paste+0 mask+0: 1(-51.75,37.4) 2(-51.75,0) 3(-51.75,-37.4) 4(51.75,-37.4) 5(51.75,0) 6(51.75,37.4)
  silkscreen extent -28,-62 28,62, body extent -55,-57 55,57, height 39
SOT-666_STM [mil]
  rect 26.87x13 smd paste+0 mask+0: 1(-27.94,19.69) 2(-27.94,0) 3(-27.94,-19.68) 4(27.94,-19.68) 5(27.94,0) 6(27.94,19.69)
  silkscreen extent -10,-38 10,38, body extent -34,-34 34,34, height 25
SW-SMD [mm] "Switch SMD type"
  rect 1.2x0.8 smd: 1(-3.5,0) 2(3.5,0)
  silkscreen extent -2.82,-1.85 2.82,1.85, body extent -3.05,-1.85 3.05,1.85, height 2.5
T05 [mm]
  oct 1.9x2.5 hole 1.2: 1(0,0)
  oval 1.9x2.5 hole 1.2: 2(1.7,-2.54) 3(3.4,0) 4(5.1,-2.54) 5(6.8,0)
  silkscreen extent -1.9,-2.1 8.7,2.8, body extent -1.95,-2.15 8.75,2.85, height 19.6
tssop20 [mm] "TSSOP, 20-Leads, Body 6.50x4.40mm, Pitch 0.65mm, IPC High Density"
  oval 1.3x0.35 smd: 1(-2.85,2.925) 2(-2.85,2.275) 3(-2.85,1.625) 4(-2.85,0.975) 5(-2.85,0.325) 6(-2.85,-0.325) 7(-2.85,-0.975) 8(-2.85,-1.625) 9(-2.85,-2.275) 10(-2.85,-2.925) 11(2.85,-2.925) 12(2.85,-2.275) 13(2.85,-1.625) 14(2.85,-0.975) 15(2.85,-0.325) 16(2.85,0.325) 17(2.85,0.975) 18(2.85,1.625) 19(2.85,2.275) 20(2.85,2.925)
  silkscreen extent -2.97,-3.25 1.8,3.78, body extent -3.23,-3.3 3.23,3.3, height 1.25
UJ20-C-H-G-MSMT-4-P16 [mm]
  rect 0.6x1.1 smd paste+0 mask+0.102: A1_B12(-3.2,2.575) A4_B9(-2.4,2.575) B1_A12(3.2,2.575) B4_A9(2.4,2.575)
  rect 0.3x1.1 smd paste+0 mask+0.102: A5(-1.25,2.575) A6(-0.25,2.575) A7(0.25,2.575) A8(1.25,2.575) B5(1.75,2.575) B6(0.75,2.575) B7(-0.75,2.575) B8(-1.75,2.575)
  oval 1x1.5 hole 0.6 slot 1.1 at 90 deg mask+0.102: SH1(-5.62,1.425) SH2(5.62,1.425)
  oval 1x1.9 hole 0.6 slot 1.5 at 90 deg mask+0.102: SH3(-5.62,-2.575) SH4(5.62,-2.575)
  silkscreen extent -3.3,3.63 -3.1,3.82

## Part data
C1 C3 C4_ C5 C6 C7 C8 C9 C10 C11 C12 C13 C14 C15 C16 C17 C18 C19 C20 C21 C22 C23 C24 C25 C26 C27 C28 C29 C30 C31 C32: "Capacitor", Publisher="Altium Limited"
  C1 C4_ C6: PackageReference=CAPR5-4X5, Published=23-Sep-2002
  C3 C5 C7 C8 C9 C10 C11 C12 C13 C14 C15 C16 C17 C18 C19 C20 C21 C22 C23 C24 C25 C26 C27 C28 C29 C30 C31 C32: LatestRevisionDate=17-Jul-2002, LatestRevisionNote="Re-released for DXP Platform.", PackageReference=RAD-0.3, Published=8-Jun-2000
C2: library part "Cap Pol 3mm", "Polarized Capacitor (Axial)", LatestRevisionDate=17-Jul-2002, LatestRevisionNote="Re-released for DXP Platform.", PackageReference=POLAR0.8, Published=8-Jun-2000, Publisher="Altium Limited"
D1 D6 D7 D9: library part "D Schottky", "Schottky Diode", Code_JEDEC=DO-214-AA, LatestRevisionDate=17-Jul-2002, LatestRevisionNote="Re-released for DXP Platform.", PackageReference=SMB, Published=8-Jun-2000, Publisher="Altium Limited"
D2 D3 D4 D8 D10 D11 D14 D15 D19 D20 D21 D22 D27 D28 D31 D32 D35 D36 D41 D42 D43 D44 D45 D46 D47 D50 D54 D56 D58 D61: library part LED0, "Typical INFRARED GaAs LED", LatestRevisionDate=08-Jul-2005, LatestRevisionNote="Mech Layer 1 removed.", PackageReference=LED-0, Published=8-Jun-2000, Publisher="Altium Limited"
D5 D23 D24 D25 D26 D29 D30 D33 D34 D37 D38 D39 D40 D48 D49 D51 D52 D53 D55 D57 D59 D60: "TVS DIODE 30V 48.4V DO214AC", MFR="Littelfuse Inc.", MPN=SMAJ30A, Solder=SMT
D12 D13 D16 D17 D18: library part SMAJ30CA, "TVS DIODE 30V 48.4V DO214AC", MFR="Littelfuse Inc.", MPN=SMAJ30A, Solder=SMT
F1: library part "Fuse 1", "Fuse", LatestRevisionDate=17-Jul-2002, LatestRevisionNote="Re-released for DXP Platform.", PackageReference=PIN-W2/E2.8, Published=8-Jun-2000, Publisher="Altium Limited"
J1: library part "Header 2", "Header, 2-Pin", LatestRevisionDate=17-Jul-2002, LatestRevisionNote="Re-released for DXP Platform.", Publisher="Altium Limited"
J2: Package=None, Availability=Unavailable, MF="{'manufacturer': u'Same Sky (Formerly CUI Devices)'}", MP=UJ20-C-H-G-MSMT-4-P16-TR, Price=None
J3: library part DB9_RA, "Receptacle Assembly, 9 Position, Right Angle", PackageDocument=O, DatasheetDocument=1-Sep-1999, Gender=Receptacle, LatestRevisionDate=17-Jul-2002, LatestRevisionNote="Re-released for DXP Platform.", Orientation="Right Angle", PackageReference=788750, Positions=9, Published=15-Jun-2001, Publisher="Altium Limited"
J4: library part "Header 3", "Header, 3-Pin", LatestRevisionDate=17-Jul-2002, LatestRevisionNote="Re-released for DXP Platform.", Publisher="Altium Limited"
J5: "Hanrun HR911105A RJ-45 Connector", MFR=HanRun, MPN=HR911105A, Solder=WAVE
J7: library part Con10, "Connector 10"
Q1: library part IRF9540, "HEXFET P-Channel Power MOSFET", ComponentLink1Description="Manufacturer Link", ComponentLink1URL=http://www.irf.com/, ComponentLink2Description=Datasheet, ComponentLink2URL=http://www.irf.com/product-info/datasheets/data/irf9540.pdf, DatasheetVersion=PD-9.421C, LatestRevisionDate=17-Jul-2002, LatestRevisionNote="Re-released for DXP Platform.", Note="Pin 2 is electrically connected to pin 4.", PackageDescription="TO, Thru-Hole, Vertical, Heatsink Mounted; 3 In-Line Leads; Pitch 2.54 mm", PackageReference=TO-220AB, PackageVersion=Feb-1997, Published=8-Jun-2000, Publisher="Altium Limited"
Q2 Q3 Q4 Q5 Q6 Q7 Q8 Q9: library part "C1815 HF SMD", "NPN transistor"
R1 R2 R3 R4 R5 R6 R7 R10 R11 R12 R13 R14 R15 R16 R17 R18 R19 R20 R21 R22 R23 R24 R25 R26 R27 R28 R29 R30 R31 R32 R33 R34 R35 R36 R37 R38 R39 R40 R41 R42 R43 R44 R45 R46 R47 R48 R49 R50 R51 R52 R53 R54 R55 R56 R57 R58 R59 R60 R61 R62 R63 R64 R65 R66 R67 RN1-1 RN1-2 RN1-3 RN1-4 RN1-5 RN1-6 RN2-1 RN2-2 RN2-3 RN2-4 RN2-5 RN2-6 RN3-1 RN3-2 RN3-3 RN3-4 RN3-5 RN3-6 RN4-1 RN4-2 RN4-3 RN4-4 RN4-5 RN4-6 RN5-1 RN5-2 RN5-3 RN5-4 RN6-1 RN6-2 RN6-3 RN6-4 RN7-1 RN7-2 RN7-3 RN7-4 RN8-1 RN8-2 RN8-3 RN8-4: "Resistor", LatestRevisionDate=17-Jul-2002, LatestRevisionNote="Re-released for DXP Platform.", PackageReference=AXIAL-0.3, Published=8-Jun-2000, Publisher="Altium Limited"
SW1 SW2: "Switch", LatestRevisionDate=17-Jul-2002, LatestRevisionNote="Re-released for DXP Platform.", PackageReference=SPST-2, Published=24-Mar-1999, Publisher="Altium Limited"
U1: "SIMPLE SWITCHER; 3A Step-Down Voltage Regulator", DigiKeyPartNumber=LM2576HVT-5.0-ND, Manufacturer="National Semiconductor", PackageTopMarking="NSUZXYTT*LM2576HVT*-5.0 P+", PowerWise=N, Code_JEDEC=TO-220-AB, ComponentLink1Description="LM2576HV Datasheet", ComponentLink1URL=http://www.national.com/ds/LM/LM2576HV.pdf, ComponentLink2Description="LM2576HV Web Page", ComponentLink2URL=http://www.national.com/pf/LM/LM2576HV.html, ComponentLink3Description="T05A Package Page", ComponentLink3URL=http://www.national.com/packaging/folders/t05a.html, CompType=Switcher, DatasheetVersion=Aug-2004, FirstPublished=4-Dec-2008, PackageDescription="TO-220, Molded, 5 Lead, Straight", PackageReference=T05A, PackageVersion="revJ, Jan-1992", PartNumber=LM2576HVT-5.0, PinCount=5, Publisher="Altium Limited", RoHS=O
U2: "ESD Protection for USB 2.0 High Speed", Manufacturer_Name=STMicroelectronics, Copyright="Copyright (C) 2025 Ultra Librarian. All rights reserved.", Manufacturer_Part_Number=USBLC6-2P6, RefDes=RefDes, Type=Type
U3: "<p>3A 1.5MHz 28V Step-Down Converter</p>", Manufacturer_Name="Monolithic Power Systems", Copyright="Copyright (C) 2026 Ultra Librarian. All rights reserved.", Manufacturer_Part_Number=MP1584EN-LF-Z, RefDes=RefDes, Type=Type
U4: library part LTC4412ES6TRMPBF, "Low Loss PowerPathâ„¢ Controller in ThinSOT", Manufacturer_Name="Analog Devices Inc", Copyright="Copyright (C) 2025 Ultra Librarian. All rights reserved.", Manufacturer_Part_Number=LTC4412ES6#TRMPBF, RefDes=RefDes, Type=Type
U5 U9: "Cắm", Chung_Loai=Cắm, Don_Vi=Con, Ma_Hang=MH003143, Ten_Linh_Kien="B0505S-1W SIP4 IC Converter DC-DC"
U6 U8 U11 U12 U13: library part IC_HCPL-3120-500E, "2.5A Gate Driver Optical Coupling 3750Vrms 1 Channel 8-DIP Gull Wing", Alternate Part Number-1=NA, Case/Package=SOIC8, Manufacturer="Broadcom Avago", Manufacturer Part Number=HCPL-3120-500E, Supplier Part Number-1=HCPL-3120-500E, Supplier-1=MOUSER
U7: "Enhanced RS-232 Line Drivers/Receivers", Manufacturer=Sipex, Volt=5V, ComponentLink1Description="Digikey Part Link", ComponentLink2Description="Open Datasheet", ComponentLink2URL=H:\LIBRARY\LIBRARY.Datasheet\, Data Rate (Max)=120kbps, Published=13-April-2009, Publisher="Hoang Nguyen", Vendor=Digikey
U10: "RS232 - RS485 (Same sn75176)"
U14: library part ch9121t_c45354919, "Type:Ethernet Transceiver Number of ports: Ethernet Speed Standards:10BASE-T；100BASE-TX Data Rate:100Mbit/s；10Mbit/s Voltage - Supply:3.2V~3.4V Voltage - Supply:3.2V~3.4V Operating Temperature:-40℃~+85℃ Operating Temperature:-40℃~+85℃ Features:Programmabl", JLCPCB Part Class="Extended Part", LCSC Part Name=网络串口透传芯片, Manufacturer=WCH(南京沁恒), ManufacturerPart=CH9121T, Operating Temperature=-40℃~+85℃, Voltage - Supply=3.2V~3.4V, AddInBom=yes, ConvertToPcb=yes, Data Rate=100Mbit/s；10Mbit/s, Datasheet=https://item.szlcsc.com/datasheet/CH9121T/47444202.html, Ethernet Speed Standards=10BASE-T；100BASE-TX, Features="Programmable LED indication；Power-on reset", FootprintName=TSSOP-20_L6.5-W4.4-P0.65-LS6.4-BL, ModelId=d00c537554e8428abe371c2c4fe2166f, ModelName=TSSOP-20_L6.5-W4.4-H1.0-LS6.4-P0.65, ModelTransform=251.969,255.906,0,90,0,0,0.0005,0,0, Supplier=LCSC, Supplier Footprint=TSSOP-20, SupplierPart=C45354919, Symbol=CH9121T_C45354919, Type="Ethernet Transceiver"
U15: library part ESP32-S3-WROOM-1, "Description", Manufacturer_Name="Espressif Systems", Copyright="Copyright (C) 2026 Ultra Librarian. All rights reserved.", Manufacturer_Part_Number=ESP32-S3-WROOM-1-N8, RefDes=RefDes, Type="Transceiver module"
U16 U17 U18 U19 U20 U21: library part "PC817 x 4", "PC817 OPTO"
Y1: library part XTAL, "Crystal Oscillator", LatestRevisionDate=17-Jul-2002, LatestRevisionNote="Re-released for DXP Platform.", PackageReference=R38, Published=8-Jun-2000, Publisher="Altium Limited"
L1 L2: Code_IEC=1005, Code_JEITA=0402, LatestRevisionDate=29-May-2009, LatestRevisionNote="IPC-7351 Footprint Added.", PackageDescription="Chip Inductor", PackageReference=0402-A, Published=8-Jun-2000, Publisher="Altium Limited"

## Via types
v1: diameter 0.8, hole 0.5, Top Layer to Bottom Layer, 76 vias
v2: diameter 0.6, hole 0.3, Top Layer to Bottom Layer, 74 vias

## Nets (pads, with @x,y where several pads share a name; then routed paths per layer and width w, separated by ;. In a path a pad name is that pad's centre, name@x,y a point inside that pad or via, vN(x,y) a via of type N, cw(c..) or ccw(c..) an arc to the next point about the centre after c; other vN are vias at no path point)
3.3V: C6.1 C17.1 C23.1 C24.2 C25.1 C26.2 C32.1 D19.1 D20.1 D21.1 D22.1 D27.1 D28.1 D31.1 D32.1 D35.1 D36.1 D41.1 D42.1 D43.1 D44.1 L2.2 R12.2 R17.2 R20.2 R28.2 R29.2 R30.2 R32.2 R33.1 R34.2 R35.2 R36.2 R37.2 RN5-1.2 RN5-2.2 RN5-3.2 RN5-4.2 RN6-1.2 RN6-2.2 RN6-3.2 RN6-4.2 RN7-1.2 RN7-2.2 RN7-3.2 RN7-4.2 RN8-1.2 RN8-2.2 RN8-3.2 RN8-4.2 U8.7 U8.8 U13.7 U13.8 U14.3 U14.18 U15.2 | length 385.4
  Top Layer w0.4: RN8-1.2@-110.011,-17.527 RN8-2.2@-107.47,-17.527 RN8-3.2@-104.929,-17.527 RN8-4.2@-102.388,-17.527 RN5-1.2@-99.847,-17.527 RN5-2.2@-97.306,-17.527 RN5-3.2@-94.765,-17.527 RN5-4.2@-92.224,-17.527 -73.405,-17.527 -73.279,-17.653 -73.279,-21.336 -70.104,-24.511 ; D21.1@-109.557,-49.195 D27.1@-107.052,-49.195 D35.1@-104.547,-49.195 D31.1@-102.041,-49.195 D41.1@-99.536,-49.195 D43.1@-97.031,-49.195 D22.1@-94.525,-49.195 D28.1@-92.02,-49.195 D32.1@-89.514,-49.195 D36.1@-87.009,-49.195 D42.1@-84.504,-49.195 D44.1@-81.998,-49.195 -82.169,-49.024 v2(-82.169,-48.26) ; -73.279,-17.527 -73.279,-12.192 -71.697,-10.61 -71.697,-3.733 -71.462,-3.498 -60.278,-3.498 -59.955,-3.175 -56.515,-3.175 -54.056,-0.716 -40.94,-0.716 -40.733,-0.923 -40.733,-1.769 D19.1@-40.597,-1.905 ; v2(-68.707,-23.114) -70.104,-24.511 ; v2(-63.754,-29.337) -65.278,-29.337 -70.104,-24.511 ; D20.1@-40.597,-5.461 D19.1@-40.597,-2.509 ; L2.2@-28.194,-54.61 L2.2@-27.86,-54.944 ; R36.2@-20.066,-13.589 R37.2@-14.859,-13.589 -9.906,-18.542 -9.906,-31.5 -9.164,-32.242 U15.2@-9.164,-34.684 -9.164,-36.048 v2(-9.144,-36.068)
  Bottom Layer w0.4: RN7-4.2@-109.883,-33.782 RN7-1.2@-102.287,-33.782 RN6-4.2@-97.31,-33.782 RN6-3.2@-94.77,-33.782 RN6-2.2@-92.23,-33.782 RN6-1.2@-89.69,-33.782 -82.169,-33.782 ; v2@-82.006,-48.097 v2(-82.169,-48.26) -82.169,-33.782 ; C26.2@-76.678,-34.777 -76.657,-34.798 -75.73,-34.798 ; R32.2@-74.803,-34.798 -75.73,-34.798 ; v2(-68.707,-23.114) -68.707,-24.638 C25.1@-68.58,-24.765 ; C25.1@-68.546,-24.795 -69.241,-25.489 U14.18@-69.241,-27.122 -69.259,-27.14 -69.259,-27.931 -72.208,-30.879 -72.333,-30.879 -72.823,-31.369 R33.1@-75.706,-31.369 ; R34.2@-67.587,-3.2 -58.953,-3.2 R35.2@-58.928,-3.175 ; v2(-63.754,-29.337) -64.262,-29.845 -65.151,-29.845 C24.2@-65.659,-30.353 -68.584,-30.353 -69.241,-31.01 U14.3@-69.241,-32.822 -69.241,-34.518 -68.199,-35.56 -62.23,-35.56 -61.468,-34.798 -57.531,-34.798 -54.559,-37.77 U13.8@-54.559,-39.97 -54.559,-42.73 R28.2@-54.305,-42.984 -54.305,-46.787 -51.181,-49.911 -51.138,-49.868 -49.276,-49.868 ; C23.1@-56.845,-39.936 -56.812,-39.97 U13.7@-53.289,-39.97 ; C6.1@-49.276,-53.086 -49.276,-49.868 ; R30.2@-42.571,-42.663 -42.571,-44.545 -42.539,-44.577 ; U8.7@-38.699,-62.431 -34.796,-62.431 -34.762,-62.465 -34.417,-62.119 -34.417,-59.436 -33.147,-58.166 -28.194,-58.166 ; R20.2@-37.634,-59.722 -37.634,-61.401 -37.429,-61.606 U8.8@-37.429,-62.431 ; R29.2@-33.919,-42.903 -33.919,-44.567 -33.909,-44.577 ; v2(-9.144,-36.068) -9.144,-39.624 -15.875,-46.355 -15.875,-55.245 -20.28,-59.65 R17.2@-26.253,-59.65 -26.253,-59.586 -27.674,-58.166 -28.194,-58.166 ; -82.169,-33.782 -80.899,-33.782 -78.867,-31.75 -76.087,-31.75 R33.1@-75.706,-31.369 ; -75.73,-34.798 -75.706,-34.774 R33.1@-75.706,-31.369 ; -49.276,-49.868 R12.2@-46.198,-49.868 -46.198,-45.563 -45.212,-44.577 -42.539,-44.577 ; -42.539,-44.577 -33.909,-44.577 ; -33.909,-44.577 -30.988,-44.577 -28.194,-47.371 L2.2@-28.194,-54.61 -28.194,-58.166
  other v2: -59.944,-3.175
5V: C4_.1 D7.2 D8.1 Q1.3 R6.2 U3.7 U4.6 | length 148.8
  Top Layer w0.5: D8.1@-40.597,-8.636 -40.597,-12.235 -39.751,-13.081 v2(-34.798,-13.081) ; v2(-34.988,-56.252) -23.823,-56.252 -22.289,-54.718 v2(-22.289,-54.141) ; Q1.3@-26.187,-17.983 -24.638,-17.983 ; U4.6@-25.991,-22.164 -25.823,-21.996 -25.171,-21.996 -24.638,-21.463 -24.638,-17.983 ; C4_.1@-19.431,-18.796 -20.244,-17.983 -24.638,-17.983
  Bottom Layer w0.254: U3.7@-39.086,-48.54 -39.086,-47.468 -37.377,-45.759 -37.377,-45.72
  Bottom Layer w0.5: -37.377,-45.72 -31.369,-45.72 -30.099,-46.99 -30.099,-55.118 -31.233,-56.252 v2(-34.988,-56.252) -35.082,-56.252 -35.428,-56.599 R6.2@-36.8,-56.599 ; v2(-34.798,-13.081) -34.798,-9.525 -32.847,-7.574 -26.335,-7.574 -24.129,-9.78 -24.129,-10.286 ; D7.2@-24.129,-14.351 D7.2@-24.129,-13.843 ; v2(-22.289,-54.141) -20.359,-54.141 -17.227,-51.009 -17.227,-45.129 -12.065,-39.967 -12.065,-15.367 -17.363,-10.069 -23.912,-10.069 -24.129,-10.286 ; C4_.1@-19.431,-18.796 -23.006,-15.221 -23.006,-14.566 -23.729,-13.843 D7.2@-24.129,-13.843 ; D7.2@-24.129,-13.843 -24.129,-10.286
5V_RS232: C9.2 C10.2 C14.2 C15.2 R14.2 R15.2 R16.2 R21.1 U5.4 U6.7 U6.8 U7.16 | length 92.7
  Bottom Layer w0.5: U5.4@-65.024,-51.98 -65.024,-71.247 -61.214,-75.057 -54.864,-75.057 -53.304,-73.497 C15.2@-53.304,-72.096 -53.304,-70.914 -53.156,-70.765 -49.276,-70.765 -49.276,-81.534 -49.911,-82.169 -57.277,-82.169 ; R14.2@-57.277,-84.836 -57.277,-82.169 ; R15.2@-57.277,-81.407 -57.277,-82.169 ; U7.16@-49.479,-69.683 -49.434,-69.683 -49.228,-69.889 -49.228,-70.765 C10.2@-46.276,-70.765 -45.94,-71.101 R21.1@-40.985,-71.101 -40.985,-72.785 -40.837,-72.934 -33.183,-72.934 -32.172,-71.923 C14.2@-32.172,-68.47 -32.127,-68.426 U6.8@-29.81,-68.426 ; R16.2@-29.532,-71.003 -29.81,-70.725 U6.8@-29.81,-68.426 ; U6.7@-28.54,-68.426 U6.8@-29.81,-68.426
5V_RS485: C18.2 C20.2 C21.2 C22.2 R22.2 R23.2 R26.2 R27.2 R31.1 U9.4 U10.8 U11.7 U11.8 U12.7 U12.8 | length 87.8
  Top Layer w0.5: v2(-55.813,-35.012) -49.665,-35.012 -49.636,-34.983 v2@-43.515,-34.983 ; U10.8@-51.054,-20.32 -51.054,-18.098 -49.022,-16.066 R22.2@-49.022,-16.002 ; R23.2@-43.561,-16.002 -43.485,-16.078 -42.469,-16.078 -40.894,-17.653 -40.894,-24.384 -39.37,-25.908 U9.4@-37.084,-25.908 ; v2(-43.53,-34.96) -32.547,-34.96 v2(-31.496,-33.909)
  Bottom Layer w0.254: U12.7@-44.857,-33.811 -44.819,-33.849 C22.2@-41.452,-33.849 ; R27.2@-43.841,-31.081 -43.587,-31.335 U12.8@-43.587,-33.811
  Bottom Layer w0.5: v2(-55.813,-35.012) -55.794,-34.993 -55.794,-31.502 R31.1@-55.567,-31.275 -55.567,-29.405 -51.054,-24.892 U10.8@-51.054,-20.32 -53.213,-20.32 C18.2@-53.34,-20.193 ; U12.8@-43.587,-33.811 -43.549,-33.849 -43.549,-34.941 v2(-43.53,-34.96) ; C20.2@-40.132,-25.908 U9.4@-37.084,-25.908 -36.861,-25.908 -36.157,-26.612 -36.157,-26.835 -35.205,-27.787 R26.2@-35.205,-31.335 -34.951,-31.589 U11.8@-34.951,-33.968 ; U11.7@-36.221,-33.968 -36.187,-34.002 C21.2@-32.665,-34.002 -32.572,-33.909 v2(-31.496,-33.909)
5VP: C2.1 C8.1 C19.1 D3.1 L1.2 Q1.2 U1.4 U4.1 U5.2 U9.2 | length 216
  Top Layer w0.6: U5.2@-59.944,-51.853 -59.944,-55.118 -59.309,-55.753 -37.973,-55.753 -34.671,-52.451 -26.924,-52.451 -25.905,-53.47 v2(-25.905,-54.836) ; v2(-53.975,-61.468) -53.975,-70.358 -59.604,-75.987 D3.1@-59.604,-78.359 -59.851,-78.359 -59.854,-78.356 -60.703,-78.356 -61.292,-78.945 -61.292,-85.754 -60.727,-86.319 -23.368,-86.319 ; U9.2@-37.084,-20.828 -36.309,-20.828 -35.036,-22.101 U4.1@-28.682,-22.101 ; Q1.2@-28.682,-18.923 U4.1@-28.682,-22.101 ; U4.1@-28.619,-22.164 U4.1@-28.682,-22.101 ; C2.1@-22.306,-69.042 -22.589,-69.042 -23.368,-69.821 -23.368,-86.319 ; C2.1@-21.861,-68.314 -21.161,-67.614 -19.735,-67.614 L1.2@-14.351,-62.23 ; U1.4@-10.668,-82.755 -11.095,-82.755 -14.659,-86.319 -23.368,-86.319
  Bottom Layer w0.6: U5.2@-59.944,-51.853 -59.754,-52.044 -59.754,-55.219 C8.1@-59.563,-55.409 ; C8.1@-59.563,-55.536 -59.563,-55.6 -53.975,-61.188 v2(-53.975,-61.468) ; C19.1@-40.132,-20.828 U9.2@-37.084,-20.828 -34.925,-20.828 -29.439,-26.314 -29.439,-44.094 -25.905,-47.628 v2(-25.905,-54.836)
24V: C1.1 D1.2 D2.1 D5.1 U1.1 | length 40.6
  Top Layer w0.254: v2(-14.986,-83.693) -17.518,-83.693 -20.574,-80.637 -20.574,-75.692 -18.542,-73.66 -15.24,-73.66 -14.698,-74.202 -14.698,-75.134 D2.1@-14.648,-75.184 -11.049,-75.184 -8.578,-77.655 U1.1@-8.128,-77.655
  Bottom Layer w0.254: v2(-14.986,-83.693) -14.986,-83.4 -14.263,-82.677 D1.2@-13.97,-82.677
  Bottom Layer w0.7: C1.1@-9.793,-69.578 -9.793,-73.392 -8.636,-74.549 -7.747,-74.549 ; U1.1@-8.128,-77.655 -8.128,-74.93 -7.747,-74.549 ; D5.1@-5.613,-74.549 -7.747,-74.549
ACT: J5.11 U14.7 | length 42.5
  Top Layer w0.254: J5.11@-67.331,-5.768 -66.099,-5.768 -63.955,-5.768 -60.96,-8.763 -60.96,-11.43 -56.896,-15.494 -56.896,-22.098 -61.063,-26.265 -63.984,-26.265 v2(-64.008,-26.289)
  Bottom Layer w0.254: U14.7@-71.841,-32.822 -71.841,-31.582 -68.961,-28.702 -66.377,-28.702 v2@-64.135,-26.46
D+: U2.4 U15.14 | length 28.1
  Top Layer w0.254: U15.14@-24.404,-34.684 -24.404,-36.079 -24.255,-36.228 -22.409,-36.228 v1(-22.355,-36.174)
  Bottom Layer w0.2: U2.4@-30.615,-15.061 -30.615,-15.994 -22.355,-24.254 v1(-22.355,-36.174)
D-: U2.6 U15.13 | length 23.1
  Top Layer w0.254: v1(-23.142,-33.493) -23.142,-34.676 U15.13@-23.134,-34.684
  Bottom Layer w0.2: U2.6@-31.615,-15.061 -31.615,-15.883 -23.142,-24.356 v1(-23.142,-33.493)
ESP32_CFG2: R33.2 U14.11 U15.10 | length 64.4
  Top Layer w0.2: v2(-74.041,-25.908) -73.964,-25.985 -73.964,-26.267 -73.688,-26.543 -68.581,-31.65 -20.46,-31.65 -19.324,-32.786 U15.10@-19.324,-34.684
  Bottom Layer w0.254: R33.2@-75.706,-29.083 -75.706,-27.827 -75.001,-27.122 U14.11@-73.791,-27.122 -73.791,-26.217 -74.041,-25.967 v2(-74.041,-25.908)
ESP32_EN1: U12.3 U15.7 | length 35.8
  Top Layer w0.254: v2(-46.057,-38.246) -46.05,-38.253 -27.637,-38.253 v2(-27.63,-38.26) ; v2(-15.621,-38.273) -15.621,-34.791 U15.7@-15.514,-34.684
  Bottom Layer w0.254: U12.3@-46.127,-39.974 -46.092,-39.939 -46.092,-38.281 v2(-46.057,-38.246) ; v2(-27.63,-38.26) -15.634,-38.26 v2(-15.621,-38.273)
ESP32_RX0: R20.1 U8.6 U15.36 | length 42.9
  Top Layer w0.254: v2(-39.969,-63.972) -35.949,-67.993 v2(-24.356,-67.993) ; v2(-14.732,-55.245) -14.732,-55.174 -12.974,-53.416 U15.36@-12.974,-52.184
  Bottom Layer w0.254: v2(-39.969,-63.972) U8.6@-39.969,-62.431 -39.969,-59.771 R20.1@-39.92,-59.722 -39.92,-59.658 -39.412,-59.15 R20.1@-39.348,-59.15 ; v2(-24.356,-67.993) -19.664,-63.301 -19.631,-63.301 -14.732,-58.402 v2(-14.732,-55.245)
ESP32_RX1: R28.1 U13.6 U15.6 | length 51.9
  Top Layer w0.254: v2(-49.403,-29.845) -49.022,-30.226 -17.78,-30.226 -14.304,-33.702 -14.304,-34.624 U15.6@-14.244,-34.684
  Bottom Layer w0.254: R28.1@-52.019,-42.984 U13.6@-52.019,-39.97 -52.019,-38.397 -49.403,-35.781 v2(-49.403,-29.845)
ESP32_RX2: U14.14 U15.8 | length 61.3
  Top Layer w0.2: v2(-71.841,-25.949) -71.841,-26.895 -67.994,-30.742 -19.189,-30.742 -16.784,-33.147 U15.8@-16.784,-34.684
  Bottom Layer w0.2: U14.14@-71.841,-27.122 v2(-71.841,-25.949)
ESP32_TX0: U6.3 U15.37 | length 20.9
  Top Layer w0.254: v1(-16.002,-57.404) -15.898,-57.3 -15.644,-57.3 -11.704,-53.36 U15.37@-11.704,-52.184
  Bottom Layer w0.254: U6.3@-27.27,-62.263 -27.27,-61.437 -26.58,-60.747 -26.484,-60.747 -26.475,-60.739 -19.337,-60.739 v1(-16.002,-57.404)
ESP32_TX1: U11.3 U15.5 | length 38.8
  Top Layer w0.254: v2(-31.369,-29.083) -17.78,-29.083 -13.161,-33.702 -13.161,-34.497 U15.5@-12.974,-34.684
  Bottom Layer w0.254: U11.3@-37.491,-40.131 -37.491,-38.608 -36.941,-38.058 -31.581,-38.058 -30.688,-37.165 -30.688,-29.245 -30.837,-29.096 -31.356,-29.096 v2(-31.369,-29.083)
ESP32_TX2: U14.13 U15.9 | length 63.2
  Top Layer w0.2: v2(-73.279,-25.019) -73.24,-25.058 -73.24,-26.176 -68.22,-31.196 -20.005,-31.196 -18.054,-33.147 U15.9@-18.054,-34.684
  Bottom Layer w0.2: v2(-73.279,-25.019) -73.245,-25.053 -73.245,-25.434 -72.491,-26.188 U14.13@-72.491,-27.122
GND: C1.2 C2.2 C4_.2 C6.2 C7.1 C8.2 C17.2 C19.2 C23.2 C24.1 C25.2 C26.1 C27.1 C28.1 C29.2 C30.1 C31.2 C32.2 D5.2 D6.1 D9.1 J1.2 J2.A1_B12 J2.B1_A12 J5.8 R1.1 R2.1 R3.1 R4.2 R5.2 R10.2 R11.1 R13.1 SW1.1 SW2.2 U1.3 U1.5 U2.2 U3.5 U4.3 U5.1 U8.5 U9.1 U13.5 U14.17 U15.1 U15.40 U15.41 U15.42 U15.43 U15.44 U15.45 U15.46 U15.47 U15.48 U15.49 U16.9 U16.11 U16.13 U16.15 U17.9 U17.11 U17.13 U17.15 U18.9 U18.11 U19.9 U19.11 | length 601.9
  Top Layer w0.2: U9.1@-37.084,-18.288 -34.247,-18.288 -33.171,-17.212 v2(-33.171,-14.403) -33.115,-14.348 -33.115,-7.828 J2.B1_A12@-32.918,-7.631 ; v2(-31.115,-12.954) -25.908,-12.954 -25.105,-12.151 -25.105,-10.986 R3.1@-25.105,-10.922 ; R3.1@-25.105,-10.859 -20.066,-5.82 SW1.1@-20.066,-2.469
  Top Layer w0.254: U16.15@-111.571,-62.388 -111.571,-64.429 -111.422,-64.578 ; U16.13@-109.031,-62.388 -109.031,-64.516 -109.093,-64.578 ; U16.11@-106.491,-62.388 -106.491,-64.513 -106.426,-64.578 ; U16.9@-103.951,-62.388 -103.951,-64.513 -103.886,-64.578 ; U18.11@-94.324,-62.388 -94.324,-64.541 -94.361,-64.578 ; U18.9@-91.784,-62.388 -91.784,-64.487 -91.694,-64.578 ; -90.805,-45.085 -113.792,-45.085 -115.316,-46.609 -115.316,-63.881 -114.619,-64.578 -111.422,-64.578 ; U17.15@-87.212,-62.344 -87.212,-64.541 -87.249,-64.578 ; U17.13@-84.672,-62.344 -84.672,-64.541 -84.709,-64.578 ; U17.11@-82.132,-62.344 -82.132,-64.541 -82.169,-64.578 ; U17.9@-79.592,-62.344 -79.592,-64.541 -79.629,-64.578 ; U19.11@-69.94,-62.344 -69.94,-64.487 -69.85,-64.578 ; J5.8@-67.686,-19.558 -67.686,-21.087 -66.167,-22.606 C27.1@-64.897,-22.606 ; -67.46,-64.464 -67.515,-64.464 ; v2(-66.523,-62.503) -67.241,-62.503 U19.9@-67.4,-62.344 -67.4,-64.349 -67.515,-64.464 ; C27.1@-64.826,-22.966 -64.77,-23.022 v2(-64.77,-23.749) ; v2(-64.194,-33.32) -61.827,-35.687 v2(-58.42,-35.687) ; v2(-57.474,-47.288) -57.43,-47.244 v2(-49.53,-47.244) v2(-44.069,-47.244) -34.29,-47.244 v2(-34.163,-47.371) ; v2(-33.02,-60.96) -32.952,-60.96 -32.698,-60.706 -15.621,-60.706 -13.462,-58.547 -7.894,-58.547 ; J2.B1_A12@-32.918,-7.528 -33.066,-7.38 -33.066,-2.84 -32.131,-1.905 -27.178,-1.905 -26.924,-2.159 v2(-26.924,-3.175) -26.924,-3.269 -26.518,-3.675 J2.A1_B12@-26.518,-7.528 -26.518,-9.445 -25.105,-10.859 R3.1@-25.105,-10.922 ; U4.3@-28.619,-24.064 -28.619,-25.102 -28.067,-25.654 -22.479,-25.654 C4_.2@-19.431,-22.606 -17.907,-22.606 -17.145,-21.844 -17.145,-16.002 -18.034,-15.113 -20.85,-15.113 -24.47,-11.494 -24.597,-11.494 R3.1@-25.105,-10.986 ; v2(-20.757,-2.469) SW1.1@-20.066,-2.469 SW2.2@-14.859,-2.469 -14.859,-2.669 -7.448,-10.08 C32.2@-7.448,-31.609 -7.894,-32.055 U15.1@-7.894,-34.684 -7.894,-36.088 -12.34,-40.534 U15.42@-14.214,-40.534 U15.43@-15.614,-40.534 U15.44@-17.014,-40.534 U15.45@-17.014,-41.934 ; U15.49@-14.214,-41.934 U15.41@-15.614,-41.934 U15.45@-17.014,-41.934 ; C1.2@-5.983,-70.086 -7.894,-68.175 -7.894,-58.547 ; -111.422,-64.578 -109.093,-64.578 ; -109.093,-64.578 -106.426,-64.578 ; -106.426,-64.578 -103.886,-64.578 ; -103.886,-64.578 -94.361,-64.578 ; -94.361,-64.578 -91.694,-64.578 ; -91.694,-64.578 -87.249,-64.578 ; -87.249,-64.578 -84.709,-64.578 ; -84.709,-64.578 -82.169,-64.578 ; -82.169,-64.578 -79.629,-64.578 ; -79.629,-64.578 -69.85,-64.578 ; -69.85,-64.578 -67.629,-64.578 -67.515,-64.464 ; U15.45@-17.014,-41.934 U15.46@-17.014,-43.334 U15.47@-15.614,-43.334 U15.48@-14.214,-43.334 -13.897,-43.652 -13.625,-43.652 -7.894,-49.383 U15.40@-7.894,-52.184 -7.894,-58.547
  Bottom Layer w0.2: U5.1@-57.404,-51.853 -54.319,-51.853 C6.2@-53.086,-53.086 ; C8.2@-57.277,-55.409 -55.409,-55.409 C6.2@-53.086,-53.086 ; R11.1@-45.847,-54.476 -45.847,-55.753 -50.419,-55.753 C6.2@-53.086,-53.086 ; v2(-33.171,-14.403) v2@-33.144,-14.377 ; U2.2@-31.115,-13.641 v2(-31.115,-12.954)